# Altium PCB DB31.PcbDoc (part 4 of 8)
Units mil, origin at the board's own origin, x right, y up, seen from the top; angles counter-clockwise.
Board outline 3236.22 x 4456.69 mil, 8 copper layers (Top Layer, MidLayer1, MidLayer2, GND-Layer5, MidLayer3, VCC, MidLayer4, Bottom Layer), stack 61.8 mil thick; 226 components, 469 nets, 1815 pads, 1562 vias.
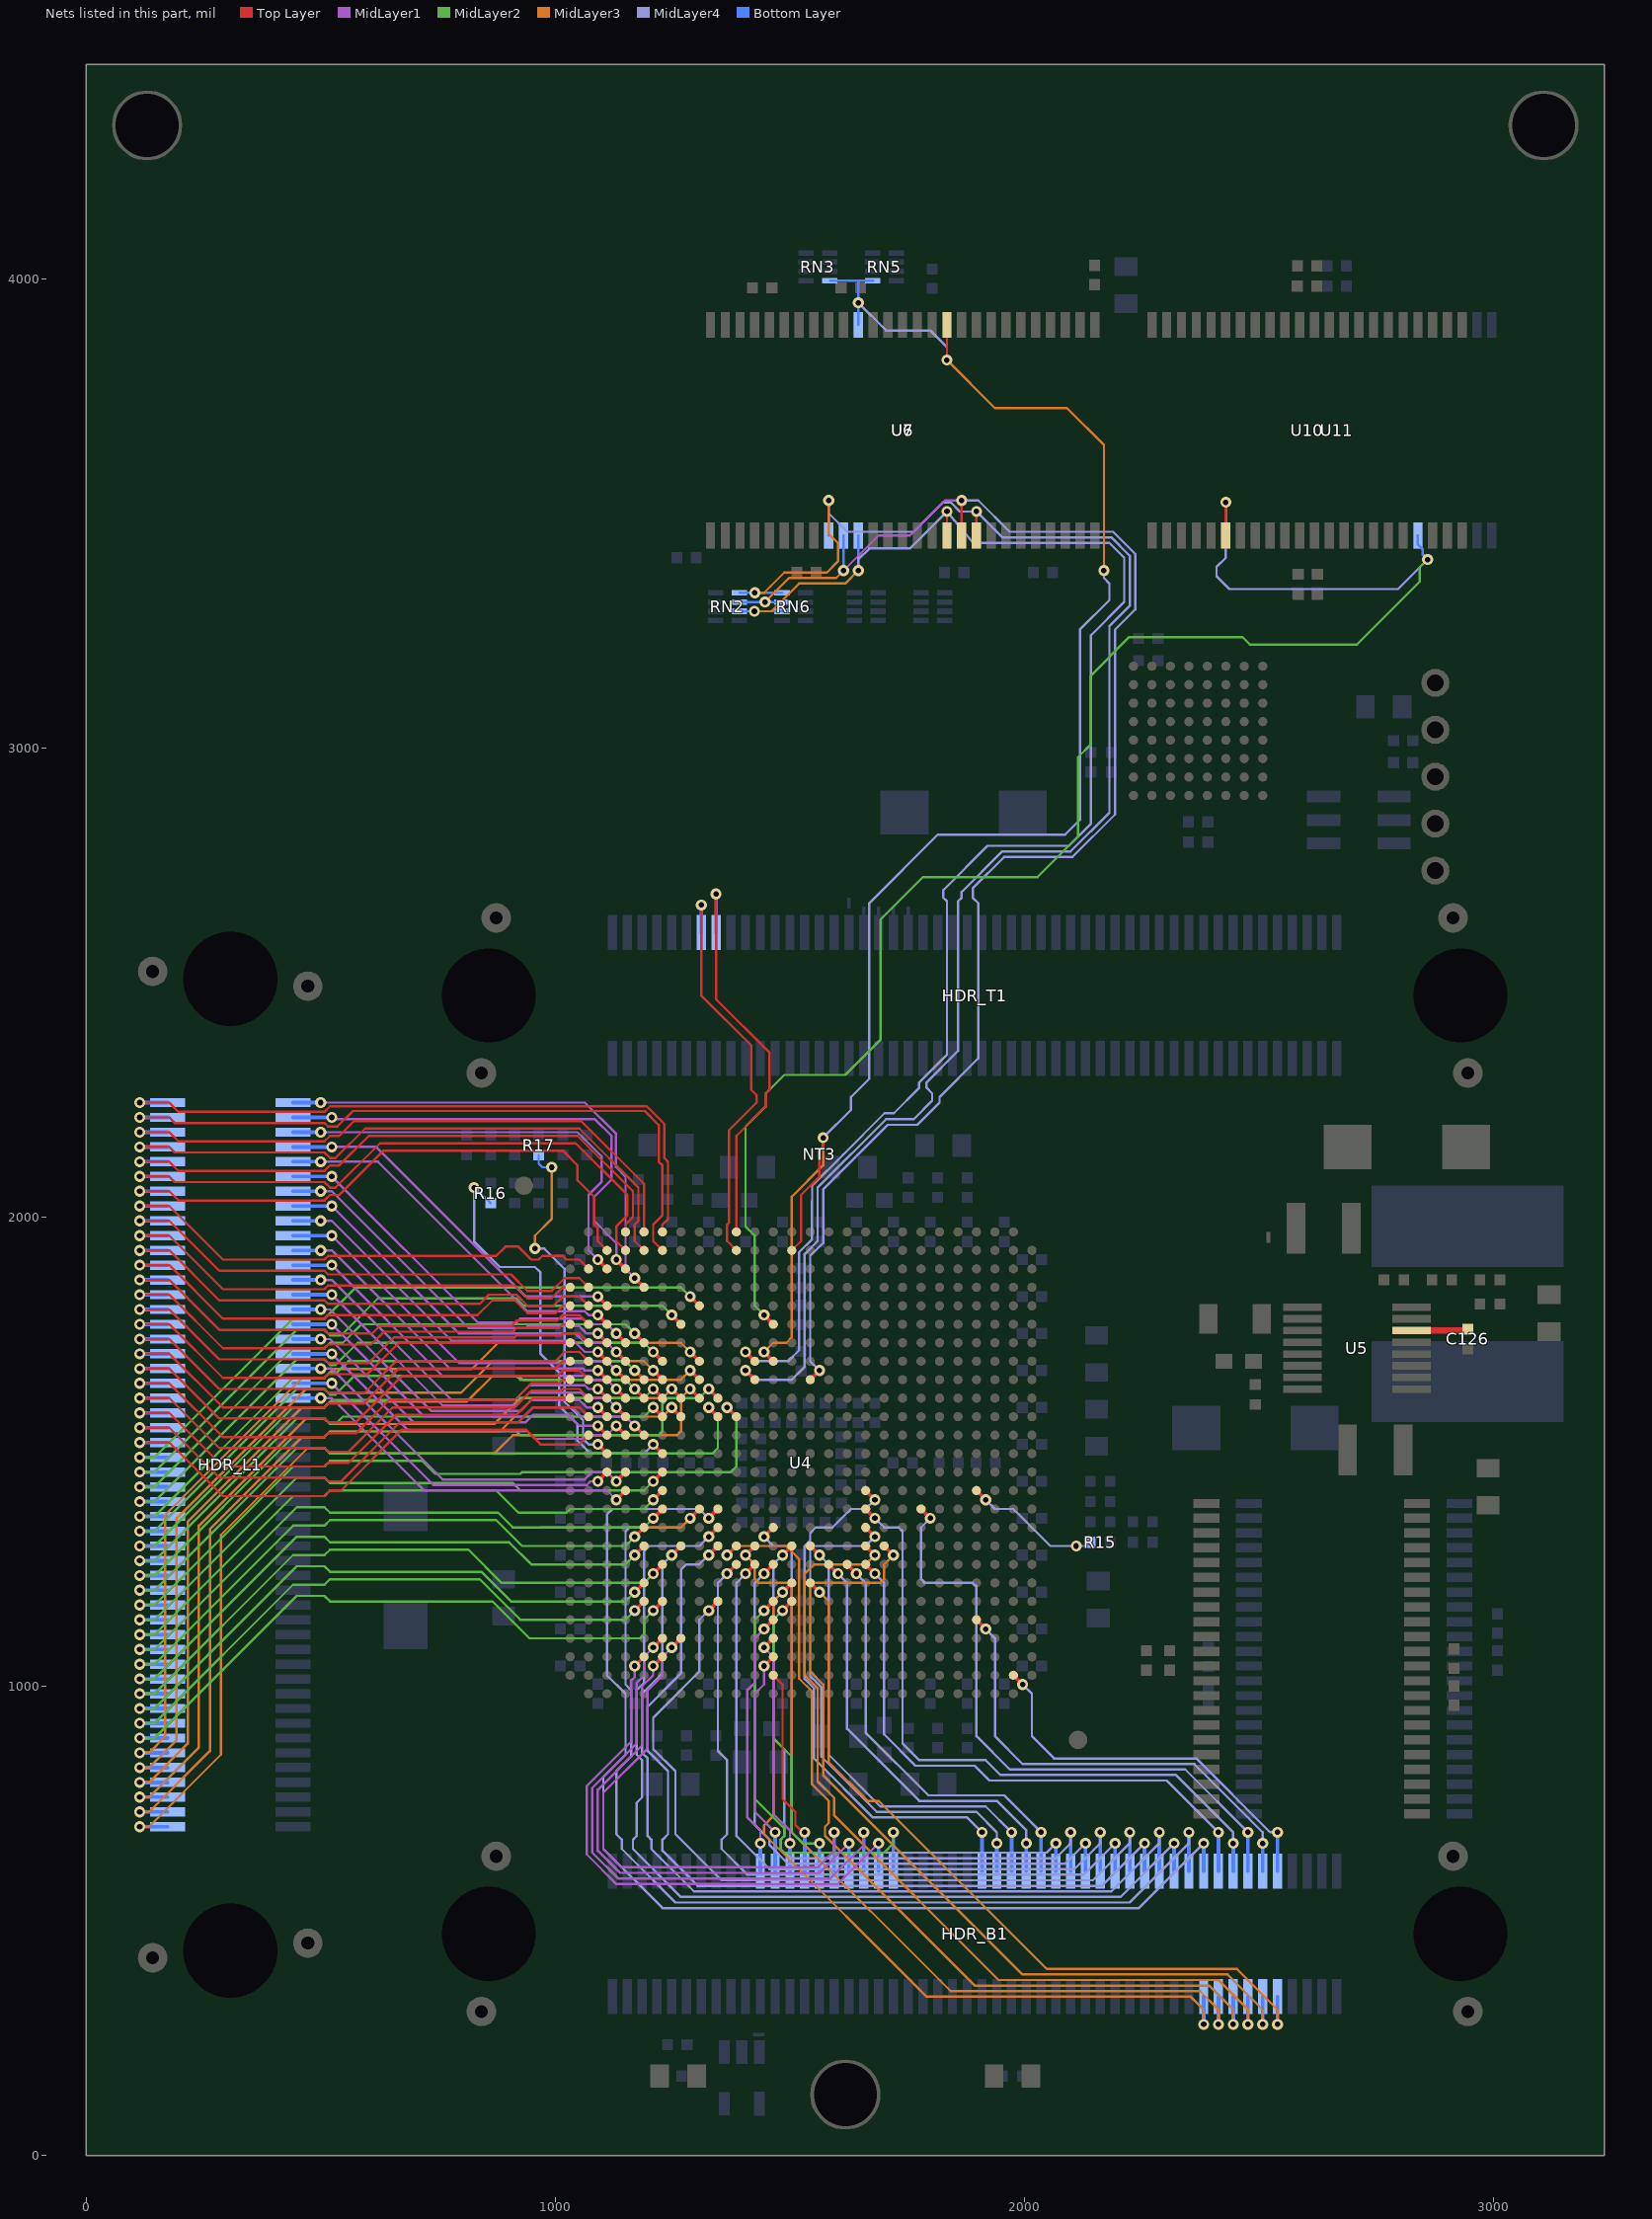
[diagram p10: the nets of this part, all layers, seen from the top]

## Via types
v1: diameter 23.62, hole 11.81, Top Layer to Bottom Layer, 947 vias
v2: diameter 23.62, hole 11.81, Top Layer to Bottom Layer, tented both sides, 476 vias
v3: diameter 27.56, hole 15.75, Top Layer to Bottom Layer, 138 vias
v4: diameter 23.62, hole 11.81, Top Layer to Bottom Layer, tented top, 1 vias

## Nets (pads, with @x,y where several pads share a name; then routed paths per layer and width w, separated by ;. In a path a pad name is that pad's centre, name@x,y a point inside that pad or via, vN(x,y) a via of type N, cw(c..) or ccw(c..) an arc to the next point about the centre after c; other vN are vias at no path point) (continued)
BUS_SDRAM_CLK: NT3.2 RN3.8 RN5.5 U4.H12 U6.38 U7.38 | length 3402.8
  Top Layer w5: NT3.2@1562.99,2141.73 1570.87,2149.61 v1(1570.87,2169.29) ; v2(1834.64,3826.77) U6.38@1834.65,3901.57
  Top Layer w7.87: v1(1444.88,1712.6) U4.H12@1464.57,1692.91
  MidLayer3 w5: v1(1444.88,1712.6) 1464.57,1732.28 1492.13,1732.28 1503.94,1744.09 1503.94,2031.49 1503.94,2039.37 1503.94,2043.31 1570.87,2110.24 v1(1570.87,2169.29) ; v2(1834.64,3826.77) 1937,3724.41 2090.55,3724.41 2169.29,3645.67 v1(2169.29,3377.95)
  MidLayer4 w5: v1(1570.87,2169.29) 1629.92,2228.35 1629.92,2255.91 1669.29,2295.28 1669.29,2669.29 1814.96,2814.96 2086.61,2814.96 2118.11,2846.46 2118.11,3251.97 2181.1,3314.96 2181.1,3350.39 2169.29,3362.2 v1(2169.29,3377.95) ; v2(1645.67,3948.82) 1704.72,3889.76 1799.21,3889.76 1834.64,3854.34 v2(1834.64,3826.77)
  Bottom Layer w5: RN3.8@1586.22,3996.06 RN5.5@1676.19,3996.06 RN5.5@1677.56,3996.06 ; U7.38@1645.67,3901.57 v2(1645.67,3948.82) 1645.67,3996.06
BUS_SDRAM_FEEDBACK: NT3.1 U4.B13 | length 221.3
  Top Layer w5: U4.B13@1503.94,1929.13 1523.62,1948.82 1523.62,2047.24 1562.99,2086.61 NT3.1@1562.99,2125.98
BUS_SDRAM_NCAS: RN2.7 RN6.6 U4.H11 U6.17 U7.17 | length 3407.4
  Top Layer w5: U6.17@1834.65,3452.76 1834.64,3499.99 v1(1834.65,3503.94)
  Top Layer w7.87: v1(1405.51,1712.6) U4.H11@1425.2,1692.91
  MidLayer3 w5: v1(1424.23,3291.34) 1460.63,3291.34 1519.68,3350.39 1618.11,3350.39 v2(1645.67,3377.95)
  MidLayer4 w5: v1(1405.51,1712.6) 1425.2,1692.91 1496.06,1692.91 1519.68,1716.54 1519.68,1925.2 1547.24,1952.76 1547.24,2031.5 1547.49,2039.37 1547.49,2067.18 1613.19,2132.87 1701.77,2221.46 1721.46,2221.46 1775.59,2275.59 1775.59,2287.4 1834.65,2346.46 1834.65,2673.23 1826.77,2681.1 1826.77,2696.85 1921.26,2791.34 2094.49,2791.34 2141.73,2838.58 2141.73,3240.16 2212.6,3311.02 2212.6,3405.51 2181.1,3437.01 1890.42,3437.01 v1(1834.65,3503.94) 1755.91,3425.2 1669.29,3425.2 1645.67,3401.57 v2(1645.67,3377.95)
  Bottom Layer w5: RN2.7@1393.3,3291.34 v1(1424.23,3291.34) RN6.6@1483.28,3291.34 RN6.6@1484.64,3291.34 ; v2(1645.67,3377.95) U7.17@1645.67,3452.76
BUS_SDRAM_NCS: RN2.5 RN6.8 U4.J11 U6.19 U7.19 | length 3648.5
  Top Layer w5: U6.19@1897.64,3452.76 v2(1897.63,3503.93)
  Top Layer w7.87: v1(1405.51,1673.23) U4.J11@1425.2,1653.54
  MidLayer3 w5: v1(1425.2,3330.71) 1444.88,3330.71 1458.54,3344.36 1488.19,3374.02 1578.74,3374.02 1602.36,3397.64 1602.36,3437.01 1582.68,3456.69 v2(1582.68,3527.56)
  MidLayer4 w5: v1(1405.51,1673.23) 1425.2,1653.54 1503.94,1653.54 1527.56,1677.16 ; 1519.68,1669.28 1531.5,1681.09 1531.5,1921.26 1559.06,1948.82 1559.06,2031.5 1559.06,2039.37 1559.06,2062.99 1704.72,2208.66 1763.78,2208.66 1803.15,2248.03 1803.15,2263.78 1791.34,2275.59 1791.34,2287.4 1858.27,2354.33 1858.27,2673.23 1866.14,2681.1 1866.14,2692.91 1952.76,2779.53 2098.43,2779.53 2181.1,2862.2 2181.1,3259.84 2224.41,3303.15 2224.41,3409.45 2185.04,3448.82 1952.76,3448.82 v2(1897.63,3503.93) 1862.21,3503.93 1842.52,3523.62 1826.77,3523.62 1763.78,3460.63 1622.05,3460.63 1582.68,3500 v2(1582.68,3527.56)
  Bottom Layer w5: RN2.5@1393.31,3330.71 v1(1425.2,3330.71) RN6.8@1483.28,3330.71 RN6.8@1484.26,3330.71 ; U7.19@1582.68,3452.76 v2(1582.68,3527.56)
BUS_SDRAM_NRAS: RN2.6 RN6.7 U4.J14 U6.18 U7.18 | length 3371.3
  Top Layer w5: U6.18@1866.14,3452.76 v1(1866.14,3527.55)
  Top Layer w7.87: U4.J14@1543.31,1653.54 v1(1562.99,1673.23)
  MidLayer1 w5: v2(1614.17,3377.95) 1688.98,3452.76 1755.91,3452.76 1830.7,3527.55 v1(1866.14,3527.55)
  MidLayer3 w5: v1(1446.86,3311.02) 1498.05,3362.2 1598.43,3362.2 v2(1614.17,3377.95)
  MidLayer4 w5: v1(1562.99,1673.23) 1543.31,1692.91 1543.31,1917.32 1570.87,1944.88 1570.87,2031.5 1570.87,2039.37 1570.87,2059.05 1708.66,2196.85 1771.65,2196.85 1818.9,2244.09 1818.9,2255.91 1901.57,2338.58 1901.57,2669.29 1889.76,2681.1 1889.76,2700.79 1956.69,2767.72 2102.36,2767.72 2192.91,2858.27 2192.91,3251.97 2236.22,3295.28 2236.22,3413.39 2188.98,3460.63 1968.5,3460.63 1901.58,3527.55 v1(1866.14,3527.55) v1@1858.27,3531.5
  Bottom Layer w5: RN2.6@1393.3,3311.02 v1(1446.86,3311.02) RN6.7@1483.28,3311.03 RN6.7@1484.64,3311.02 ; v2(1614.17,3377.95) U7.18@1614.17,3452.76
BUS_SRAM_NCS: U4.F12 U10.6 U11.6 | length 3565.7
  Top Layer w5: U10.6@2429.13,3452.76 2429.13,3503.94 v2(2429.13,3523.62)
  Top Layer w7.87: v1(1444.88,1791.34) U4.F12@1464.57,1771.65
  MidLayer2 w5: v1(1444.88,1791.34) 1425.2,1811.02 1425.2,1866.14 1425.2,1960.62 1405.51,1980.31 1405.51,2031.49 1405.51,2039.37 1405.51,2192.91 1448.82,2236.22 1448.82,2244.09 1448.82,2263.78 1488.19,2303.15 1618.11,2303.15 1692.91,2377.95 1692.91,2633.86 1783.46,2724.41 2027.56,2724.41 2114.17,2811.02 2114.17,2980.32 2141.73,3007.87 2141.73,3154.53 2223.42,3236.22 2464.57,3236.22 2480.32,3220.47 2708.66,3220.47 2842.52,3354.33 2842.52,3384.83 v2(2859.27,3401.57)
  MidLayer4 w5: v2(2429.13,3523.62) 2429.13,3405.51 2409.45,3385.83 2409.45,3366.14 2437.01,3338.58 2796.28,3338.58 v2(2859.27,3401.57)
  Bottom Layer w5: U11.6@2838.58,3452.76 2838.58,3433.42 2848.92,3423.08 2848.92,3411.92 v2(2859.27,3401.57)
BUZZER: HDR_B1.40 U4.AA12 | length 931.1
  Top Layer w7.87: v1(1444.88,1161.41) U4.AA12@1464.57,1181.1
  MidLayer2 w5: v1(1444.88,1161.41) 1425.2,1141.73 1425.2,921.26 1425.2,909.45 1425.2,759.84 1488.19,696.85 1488.19,681.1 1480.31,673.23 1480.31,653.54 1488.19,645.67 1700.79,645.67 1720.47,665.35 v2(1720.47,688.98)
  Bottom Layer w7.87: HDR_B1.40@1720.48,606.3 v2(1720.47,688.98)
CAN_RXD: HDR_T1.14 U4.B10 | length 878.4
  Top Layer w5: v2(1311.02,2665.35) 1311.02,2472.44 1417.32,2366.14 1417.32,2271.65 1429.13,2259.84 1429.13,2244.09 1370.08,2185.04 1370.08,2043.31 1370.08,2031.5 1370.08,1988.19 1366.14,1984.25 1366.14,1948.82 U4.B10@1385.83,1929.13
  Bottom Layer w7.87: HDR_T1.14@1311.02,2606.3 v2(1311.02,2665.35)
CAN_TXD: HDR_T1.16 U4.A10 | length 879.8
  Top Layer w5: v2(1342.52,2688.98) 1342.52,2464.57 1456.69,2350.39 1456.69,2271.66 1448.82,2263.78 1448.82,2236.22 1385.83,2173.23 1385.83,2043.31 1385.83,2031.5 U4.A10@1385.83,1968.5
  Bottom Layer w7.87: HDR_T1.16@1342.52,2606.3 v2(1342.52,2688.98)
COMP: C126.2 U5.6 | length 121.4
  Top Layer w13.78: U5.6@2824.58,1758.25 2942.3,1758.25 C126.2@2944.88,1760.82
CONF_DONE: R15.2 U4.R23 | length 302.6
  Top Layer w7.87: U4.R23@1897.64,1417.32 v1(1917.33,1397.64)
  MidLayer4 w5: v1(1917.33,1397.64) 1937.01,1377.95 1976.38,1377.95 2055.12,1299.21 v1(2110.24,1299.21)
  Bottom Layer w5: v1@2110.24,1307.08 v1(2110.24,1299.21) 2132.36,1299.21 R15.2@2140.23,1307.08
DATA0: R17.2 U4.N3 | length 760.6
  Top Layer w7.87: v1(1090.55,1515.75) U4.N3@1110.24,1496.06
  MidLayer3 w5: v1(956.69,1933.07) 956.69,1960.63 992.13,1996.06 v1(992.13,2106.3)
  MidLayer4 w5: v1(956.69,1933.07) 976.38,1933.07 1019.69,1889.76 1019.69,1606.3 1059.06,1566.93 1059.06,1527.56 1070.87,1515.75 v1(1090.55,1515.75)
  Bottom Layer w5: R17.2@964.56,2132.36 964.56,2114.18 972.44,2106.3 v1(992.13,2106.3)
DAU_RESET_SW: HDR_B1.38 U4.AD5 | length 1214.9
  Top Layer w7.87: v1(1169.29,1043.3) U4.AD5@1188.98,1062.99
  MidLayer1 w5: v1(1169.29,1043.3) 1169.29,1019.68 1161.42,1011.81 1161.42,921.26 1161.42,909.45 1161.42,881.89 1066.93,787.4 1066.93,641.73 1129.92,578.74 1602.36,578.74 v2(1688.98,665.35)
  Bottom Layer w7.87: HDR_B1.38@1688.98,606.3 v2(1688.98,665.35)
DAU_TFT_BLIGHT: HDR_B1.91 U4.Y14 | length 1664
  Top Layer w7.87: U4.Y14@1543.31,1220.47 v1(1562.99,1200.78)
  MidLayer3 w5: v1(1562.99,1200.78) 1582.68,1181.1 1582.68,921.26 1582.68,909.45 1582.68,838.58 1665.35,755.91 1688.98,755.91 2047.24,397.64 2452.76,397.64 2539.37,311.02 v2(2539.37,279.53)
  Bottom Layer w7.87: v2(2539.37,279.53) HDR_B1.91@2539.37,338.58
DAU_TFT_BLUE0: HDR_B1.62 U4.U12 | length 1346.5
  Top Layer w7.87: v1(1444.88,1318.9) U4.U12@1464.57,1338.58
  MidLayer4 w5: v1(1444.88,1318.9) 1464.57,1299.21 1492.13,1299.21 1503.94,1287.4 1503.94,921.26 1503.94,909.45 1503.94,688.98 1547.24,645.67 2047.24,645.67 v2(2066.93,665.35)
  Bottom Layer w7.87: HDR_B1.62@2066.93,606.3 v2(2066.93,665.35)
DAU_TFT_BLUE1: HDR_B1.64 U4.V13 | length 1420.6
  Top Layer w7.87: v1(1484.25,1279.53) U4.V13@1503.94,1299.21
  MidLayer4 w5: v1(1484.25,1279.53) 1464.57,1259.84 1464.57,921.26 1464.57,909.45 1464.57,889.76 1488.19,866.14 1488.19,681.1 1480.31,673.23 1480.31,653.54 1500,633.86 2066.93,633.86 2098.42,665.35 v2(2098.42,688.98)
  Bottom Layer w7.87: v2(2098.42,688.98) HDR_B1.64@2098.43,606.3
DAU_TFT_BLUE2: HDR_B1.66 U4.W12 | length 1394.3
  Top Layer w7.87: v1(1444.88,1240.16) U4.W12@1464.57,1259.84
  MidLayer4 w5: v1(1444.88,1240.16) 1425.2,1220.47 1425.2,921.26 1425.2,909.45 1425.2,704.72 1456.69,673.23 1456.69,661.42 1496.06,622.05 2086.62,622.05 v2(2129.92,665.35)
  Bottom Layer w7.87: HDR_B1.66@2129.92,606.3 v2(2129.92,665.35)
DAU_TFT_BLUE3: HDR_B1.68 U4.W11 | length 1529.1
  Top Layer w7.87: v1(1405.51,1240.16) U4.W11@1425.2,1259.84
  MidLayer4 w5: v1(1405.51,1240.16) 1385.83,1220.47 1385.83,921.26 1385.83,909.45 1385.83,681.1 1456.69,610.24 2106.3,610.24 2161.42,665.35 v2(2161.42,688.98)
  Bottom Layer w7.87: HDR_B1.68@2161.42,606.3 v2(2161.42,688.98)
DAU_TFT_BLUE4: HDR_B1.70 U4.W10 | length 1583.8
  Top Layer w7.87: v1(1366.14,1240.16) U4.W10@1385.83,1259.84
  MidLayer4 w5: v1(1366.14,1240.16) 1346.46,1220.47 1346.46,921.26 1346.46,909.45 1346.46,862.2 1366.14,842.52 1366.14,685.04 1354.33,673.23 1354.33,653.54 1409.45,598.43 2125.98,598.43 v2(2192.91,665.35)
  Bottom Layer w7.87: HDR_B1.70@2192.92,606.3 v2(2192.91,665.35)
DAU_TFT_CL1: HDR_B1.88 U4.T20 | length 1355.7
  Top Layer w7.87: U4.T20@1779.53,1377.95 v1(1799.22,1358.27)
  MidLayer4 w5: v1(1799.22,1358.27) 1779.53,1338.58 1779.53,1228.35 1787.4,1220.47 1889.76,1220.47 1897.64,1212.6 1897.64,921.26 1897.64,911.26 1897.64,893.7 1968.5,822.83 2342.52,822.83 v2@2476.38,688.98
  Bottom Layer w7.87: HDR_B1.88@2476.38,606.3 v2(2476.38,688.98)
DAU_TFT_CL2: HDR_B1.90 U4.AB23 | length 1061.7
  Top Layer w7.87: U4.AB23@1897.64,1141.73 v1(1917.33,1122.04)
  MidLayer4 w5: v1(1917.33,1122.04) 1937.01,1102.36 1937.01,921.26 1937.01,909.45 1937.01,893.7 1996.06,834.65 2362.2,834.65 2507.87,688.98 v2(2507.87,665.35)
  Bottom Layer w7.87: v2(2507.87,665.35) HDR_B1.90@2507.88,606.3 v2(2507.87,665.35)
DAU_TFT_CL3: HDR_B1.92 U4.AE25 | length 837.3
  Top Layer w7.87: U4.AE25@1976.38,1023.62 v1(1996.07,1003.94)
  MidLayer4 w5: v1(1996.07,1003.94) 2015.75,984.25 2015.75,921.26 2015.75,909.45 2015.75,893.7 2062.99,846.46 2366.14,846.46 2523.62,688.98 v2(2539.37,688.98)
  Bottom Layer w7.87: HDR_B1.92@2539.37,606.3 v2(2539.37,688.98)
DAU_TFT_DISP_ON: HDR_B1.89 U4.V18 | length 1898.8
  Top Layer w7.87: U4.V18@1700.79,1299.21 v1(1720.47,1279.53)
  MidLayer3 w5: v1(1720.47,1279.53) 1700.79,1259.84 1700.79,1228.35 1692.91,1220.47 1551.18,1220.47 1543.31,1212.6 1543.31,1031.49 1570.87,1003.94 1570.87,921.26 1570.87,909.45 1570.87,811.02 1996.06,385.83 2433.07,385.83 2507.87,311.02 v2(2507.88,279.53)
  Bottom Layer w7.87: v2(2507.88,279.53) HDR_B1.89@2507.88,338.58
DAU_TFT_GREEN0: HDR_B1.72 U4.AA9 | length 1720.9
  Top Layer w7.87: v1(1326.77,1161.42) U4.AA9@1346.46,1181.1
  MidLayer4 w5: v1(1326.77,1161.42) 1307.09,1141.73 1307.09,1031.5 1208.66,933.07 1208.66,921.26 1208.66,909.45 1208.66,866.14 1255.91,818.9 1255.91,685.04 1354.33,586.61 2145.67,586.61 2224.41,665.36 v2(2224.41,688.98)
  Bottom Layer w7.87: HDR_B1.72@2224.41,606.3 v2(2224.41,688.98)
DAU_TFT_GREEN1: HDR_B1.74 U4.V9 | length 1905.7
  Top Layer w7.87: v1(1326.77,1279.53) U4.V9@1346.46,1299.21
  MidLayer4 w5: v1(1326.77,1279.53) 1307.09,1259.84 1279.53,1259.84 1267.72,1248.03 1267.72,1027.56 1196.85,956.69 1196.85,921.26 1196.85,909.45 1196.85,862.2 1240.16,818.9 1240.16,685.04 1228.35,673.23 1228.35,649.61 1303.15,574.8 2165.35,574.8 v2(2255.9,665.35)
  Bottom Layer w7.87: HDR_B1.74@2255.91,606.3 v2(2255.9,665.35)
DAU_TFT_GREEN2: HDR_B1.76 U4.V7 | length 1957
  Top Layer w7.87: v1(1248.03,1279.53) U4.V7@1267.72,1299.21
  MidLayer4 w5: v1(1248.03,1279.53) 1228.35,1259.84 1228.35,1027.56 1185.04,984.25 1185.04,921.26 1185.04,909.45 1185.04,858.27 1196.85,846.46 1196.85,681.1 1204.72,673.23 1204.72,653.54 1295.28,562.99 2185.04,562.99 2287.4,665.35 v2(2287.4,688.98)
  Bottom Layer w7.87: HDR_B1.76@2287.41,606.3 v2(2287.4,688.98)
DAU_TFT_GREEN3: HDR_B1.78 U4.U9 | length 2134.4
  Top Layer w7.87: v1(1326.77,1318.9) U4.U9@1346.46,1338.58
  MidLayer4 w5: v1(1326.77,1318.9) 1307.09,1299.21 1200.79,1299.21 1188.98,1287.4 1188.98,1007.87 1173.23,992.13 1173.23,921.26 1173.23,909.45 1173.23,854.33 1185.04,842.52 1185.04,763.78 1173.23,751.97 1173.23,681.1 1165.35,673.23 1165.35,653.54 1267.72,551.18 2204.72,551.18 v2(2318.9,665.35)
  Bottom Layer w7.87: HDR_B1.78@2318.9,606.3 v2(2318.9,665.35)
DAU_TFT_GREEN4: HDR_B1.80 U4.T8 | length 2618.5
  Top Layer w7.87: v1(1287.4,1358.27) U4.T8@1307.09,1377.95
  MidLayer3 w5: 968.51,1338.58 1267.72,1338.58 v1(1287.4,1358.27)
  MidLayer4 w5: v1(1287.4,1358.27) 1267.72,1338.58 1157.48,1338.58 1149.61,1330.71 1149.61,1003.94 1161.42,992.13 1161.42,921.26 1161.42,909.45 1161.42,850.39 1129.92,818.9 1129.92,685.04 1141.73,673.23 1141.73,653.54 1255.91,539.37 2224.41,539.37 2350.39,665.35 v2(2350.39,688.98)
  Bottom Layer w7.87: HDR_B1.80@2350.4,606.3 v2(2350.39,688.98)
DAU_TFT_GREEN5: HDR_B1.82 U4.T9 | length 2453.7
  Top Layer w7.87: v1(1326.77,1358.27) U4.T9@1346.46,1377.95
  MidLayer4 w5: v1(1326.77,1358.27) 1307.09,1377.95 1122.05,1377.95 1110.24,1366.14 1110.24,1023.62 1149.61,984.25 1149.61,921.26 1149.61,909.45 1149.61,854.33 1102.36,807.09 1102.36,653.54 1228.35,527.56 2244.09,527.56 v2(2381.89,665.35)
  Bottom Layer w7.87: HDR_B1.82@2381.89,606.3 v2(2381.89,665.35)
DAU_TFT_IRQ: HDR_B1.81 U4.Y13 | length 1742.4
  Top Layer w7.87: v1(1484.25,1200.78) U4.Y13@1503.94,1220.47
  MidLayer3 w5: v1(1484.25,1200.78) 1464.57,1181.1 1464.57,921.26 1464.57,909.45 1464.57,723.43 1444.88,703.74 1444.88,685.04 1791.34,338.58 2354.33,338.58 2381.89,311.02 v2(2381.89,279.53)
  Bottom Layer w7.87: v2(2381.89,279.53) HDR_B1.81@2381.89,338.58
DAU_TFT_M: HDR_B1.87 U4.V17 | length 1879.3
  Top Layer w7.87: U4.V17@1661.42,1299.21 v1(1681.1,1279.53)
  MidLayer3 w5: v1(1681.1,1279.53) 1661.42,1259.84 1551.18,1259.84 1531.5,1240.16 1531.5,1160.43 1531.5,1023.62 1559.06,996.06 1559.06,921.26 1559.06,909.45 1559.06,797.24 1594.49,761.81 1594.49,724.41 1944.88,374.02 2413.39,374.02 2476.38,311.02 v2(2476.38,279.53)
  Bottom Layer w7.87: v2(2476.38,279.53) HDR_B1.87@2476.38,338.58
DAU_TFT_MUX: HDR_B1.85 U4.V10 | length 1934.8
  Top Layer w7.87: v1(1366.14,1279.53) U4.V10@1385.83,1299.21
  MidLayer3 w5: v1(1366.14,1279.53) 1385.83,1299.21 1492.13,1299.21 1519.68,1271.65 1519.68,1016.73 1547.24,989.17 1547.24,921.26 1547.24,909.45 1547.24,791.34 1582.68,755.91 1582.68,708.66 1574.8,700.79 1574.8,681.1 1893.7,362.2 2393.7,362.2 2444.88,311.02 v2(2444.88,279.53)
  Bottom Layer w7.87: v2(2444.88,279.53) HDR_B1.85@2444.89,338.58
DAU_TFT_POL: HDR_B1.83 U4.V11 | length 1852.6
  Top Layer w7.87: v1(1405.51,1279.53) U4.V11@1425.2,1299.21
  MidLayer3 w5: v1(1405.51,1279.53) 1425.2,1259.84 1425.2,1228.35 1433.07,1220.47 1496.06,1220.47 1503.94,1212.6 1503.94,921.26 1503.94,909.45 1503.94,688.98 1842.52,350.39 2374.02,350.39 2413.39,311.03 v2(2413.39,279.53)
  Bottom Layer w7.87: v2(2413.39,279.53) HDR_B1.83@2413.39,338.58
DAU_TFT_RED0: HDR_B1.52 U4.R17 | length 1194.5
  Top Layer w7.87: U4.R17@1661.42,1417.32 v1(1681.1,1397.64)
  MidLayer4 w5: v1(1681.1,1397.64) 1661.42,1377.95 1629.92,1377.95 1590.55,1338.58 1555.12,1338.58 1543.31,1326.77 1543.31,1311.02 1531.5,1299.21 1531.5,1015.75 1551.18,996.06 1551.18,921.26 1551.18,909.45 1551.18,846.46 1677.17,720.47 1870.08,720.47 1877.95,720.47 v2(1909.45,688.98)
  Bottom Layer w7.87: HDR_B1.52@1909.45,606.3 v2(1909.45,688.98)
DAU_TFT_RED1: HDR_B1.54 U4.U17 | length 1151.3
  Top Layer w7.87: U4.U17@1661.42,1338.58 v1(1681.1,1318.9)
  MidLayer4 w5: v1(1681.1,1318.9) 1661.42,1299.21 1551.18,1299.21 1543.31,1291.34 1543.31,1021.65 1566.93,998.03 1566.93,921.26 1566.93,909.45 1566.93,850.39 1685.04,732.28 1897.64,732.28 1940.94,688.98 v2(1940.94,665.35)
  Bottom Layer w7.87: HDR_B1.54@1940.95,606.3 v2(1940.94,665.35)
DAU_TFT_RED2: HDR_B1.56 U4.V14 | length 1002.1
  Top Layer w7.87: U4.V14@1543.31,1299.21 v1(1562.99,1279.53)
  MidLayer4 w5: v1(1562.99,1279.53) 1582.68,1259.84 1582.68,921.26 1582.68,909.45 1582.68,854.33 1692.91,744.1 1881.89,744.1 1917.32,744.09 v2(1972.44,688.98)
  Bottom Layer w7.87: HDR_B1.56@1972.44,606.3 v2(1972.44,688.98)
DAU_TFT_RED3: HDR_B1.58 U4.W15 | length 924.9
  Top Layer w7.87: U4.W15@1582.68,1259.84 v1(1602.36,1240.16)
  MidLayer4 w5: v1(1602.36,1240.16) 1622.05,1220.47 1622.05,921.26 1622.05,909.45 1775.59,755.91 1940.94,755.91 2003.94,692.92 v2(2003.94,665.35)
  Bottom Layer w7.87: HDR_B1.58@2003.94,606.3 v2(2003.94,665.35)
DAU_TFT_RED4: HDR_B1.60 U4.W16 | length 935.1
  Top Layer w7.87: U4.W16@1622.05,1259.84 v1(1641.73,1240.16)
  MidLayer4 w5: v1(1641.73,1240.16) 1661.42,1220.47 1661.42,921.26 1661.42,910.43 1661.42,901.57 1795.28,767.71 1956.69,767.71 ; 1940.94,767.72 1956.69,767.72 ; v2(2035.43,688.98) 1956.69,767.71
  Bottom Layer w7.87: HDR_B1.60@2035.44,606.3 v2(2035.43,688.98)
DAU_TFT_STH: HDR_B1.86 U4.T17 | length 1416.7
  Top Layer w7.87: U4.T17@1661.42,1377.95 v1(1681.1,1358.27)
  MidLayer4 w5: v1(1681.1,1358.27) 1700.79,1338.58 1732.28,1338.58 1740.16,1330.71 1740.16,921.26 1740.16,909.45 1740.16,877.95 1775.59,842.52 1917.32,842.52 1948.82,811.02 2322.84,811.02 2444.88,688.98 v2(2444.88,665.35)
  Bottom Layer w7.87: HDR_B1.86@2444.89,606.3 v2(2444.88,665.35)
DAU_TFT_STV: HDR_B1.84 U4.W17 | length 1260.2
  Top Layer w7.87: U4.W17@1661.42,1259.84 v1(1681.1,1240.16)
  MidLayer4 w5: v1(1681.1,1240.16) 1700.79,1220.47 1700.79,921.26 1700.79,911.26 1700.79,897.64 1767.72,830.71 1893.7,830.71 1925.2,799.21 2303.15,799.21 v2@2413.38,688.98
  Bottom Layer w7.87: HDR_B1.84@2413.39,606.3 v2(2413.38,688.98)
DCLK: R16.2 U4.N6 | length 931.9
  Top Layer w7.87: v1(1208.66,1515.75) U4.N6@1228.35,1496.06
  MidLayer4 w5: v1(826.77,2062.99) 826.77,1948.6 881.67,1893.7 956.69,1893.7 968.5,1881.89 968.5,1708.66 1007.87,1669.29 1007.87,1598.42 1047.24,1559.05 1047.24,1523.62 1059.88,1510.98 1074.8,1496.06 1188.98,1496.06 v1(1208.66,1515.75)
  Bottom Layer w5: v1(826.77,2062.99) 860.7,2031.5 R16.2@862.2,2030
DIP0: HDR_B1.22 U4.AB12 | length 569.7
  Top Layer w7.87: v1(1444.88,1122.04) U4.AB12@1464.57,1141.73
  MidLayer1 w5: v2(1437.01,665.35) 1437.01,692.91 1409.45,720.47 1409.45,909.45 1409.45,921.26 1409.45,992.13 1425.2,1007.87 1425.2,1102.36 v1(1444.88,1122.04)
  Bottom Layer w7.87: HDR_B1.22@1437.01,606.3 v2(1437.01,665.35)
DIP1: HDR_B1.24 U4.AD12 | length 490.9
  Top Layer w7.87: v1(1444.88,1043.3) U4.AD12@1464.57,1062.99
  MidLayer1 w5: v1(1444.88,1043.3) 1444.88,1003.93 1425.2,984.25 1425.2,921.26 1425.2,909.45 1425.2,732.28 v2(1468.5,688.98)
  Bottom Layer w7.87: HDR_B1.24@1468.51,606.3 v2(1468.5,688.98)
DIP2: HDR_B1.26 U4.AC12 | length 527
  Top Layer w7.87: v1(1444.88,1082.67) U4.AC12@1464.57,1102.36
  MidLayer1 w5: v1(1444.88,1082.67) 1464.57,1062.99 1464.57,921.26 1464.57,909.45 1464.57,728.35 1500,692.91 v2(1500,665.35)
  Bottom Layer w7.87: HDR_B1.26@1500,606.3 v2(1500,665.35)
DIP3: HDR_B1.28 U4.AE12 | length 447.4
  Top Layer w5: U4.AE12@1464.57,1023.62 1484.25,1003.93 1484.25,921.26 1484.25,909.45 1484.25,759.84 1511.81,732.28 1511.81,704.72 1527.56,688.98 v2(1531.5,688.98)
  Bottom Layer w7.87: HDR_B1.28@1531.5,606.3 v2(1531.5,688.98)
DIP4: HDR_B1.30 U4.AA13 | length 652.6
  Top Layer w7.87: v1(1484.25,1161.41) U4.AA13@1503.94,1181.1
  MidLayer2 w5: v1(1484.25,1161.41) 1464.57,1141.73 1464.57,921.26 1464.57,909.45 1464.57,889.76 1503.94,850.39 1503.94,688.98 1527.56,665.35 v2(1562.99,665.35)
  Bottom Layer w7.87: HDR_B1.30@1562.99,606.3 v2(1562.99,665.35)
DIP5: HDR_B1.32 U4.AC7 | length 1162.5
  Top Layer w7.87: v1(1248.03,1082.67) U4.AC7@1267.72,1102.36
  MidLayer1 w5: v1(1248.03,1082.67) 1228.35,1062.99 1228.35,1023.62 1196.85,992.12 1196.85,921.26 1196.85,909.45 1196.85,867.82 1102.36,773.33 1102.36,653.54 1141.73,614.17 1559.06,614.17 1594.49,649.61 v2(1594.49,688.98)
  Bottom Layer w7.87: HDR_B1.32@1594.49,606.3 v2(1594.49,688.98)
DIP6: HDR_B1.34 U4.AD6 | length 1110.6
  Top Layer w7.87: v1(1208.66,1043.3) U4.AD6@1228.35,1062.99
  MidLayer1 w5: v1(1208.66,1043.3) 1208.66,1023.62 1185.04,1000 1185.04,921.26 1185.04,909.45 1185.04,874.02 1090.55,779.53 1090.55,649.61 1137.8,602.36 1562.99,602.36 v2(1625.98,665.35)
  Bottom Layer w7.87: HDR_B1.34@1625.99,606.3 v2(1625.98,665.35)
DIP7: HDR_B1.36 U4.AC6 | length 1259.8
  Top Layer w7.87: v1(1208.66,1082.67) U4.AC6@1228.35,1102.36
  MidLayer1 w5: v1(1208.66,1082.67) 1188.98,1062.99 1188.98,1023.62 1173.23,1007.87 1173.23,921.26 1173.23,909.45 1173.23,877.95 1078.74,783.46 1078.74,645.67 1133.86,590.55 1586.61,590.55 1657.48,661.42 v2(1657.48,688.98)
  Bottom Layer w7.87: HDR_B1.36@1657.48,606.3 v2(1657.48,688.98)
EXTEND_A0: HDR_L1.1 U4.A6 | length 1467.7
  Top Layer w5: v2(114.17,2244.09) 177.17,2244.09 196.85,2224.41 409.45,2224.41 ; 385.83,2224.41 507.88,2224.41 519.69,2236.22 1194.66,2236.22 1232.28,2198.6 1232.28,2125.98 1240.16,2118.11 1240.16,2043.31 1240.16,2031.5 1240.16,1996.06 1228.35,1984.25 U4.A6@1228.35,1968.5
  Bottom Layer w7.87: v2(114.17,2244.09) HDR_L1.1@173.23,2244.09
EXTEND_A1: HDR_L1.3 U4.B6 | length 1533.7
  Top Layer w5: v2(114.17,2212.6) 153.54,2212.6 ; 137.8,2212.6 177.17,2212.6 188.98,2200.79 409.45,2200.79 ; 377.95,2200.79 507.88,2200.79 515.75,2192.91 535.43,2192.91 568.74,2226.22 1190.52,2226.22 1220.47,2196.27 1220.47,2118.11 1228.35,2110.24 1228.35,2043.31 1228.35,2031.5 1228.35,2003.94 1208.66,1984.25 1208.66,1948.82 U4.B6@1228.35,1929.13
  Bottom Layer w7.87: v2(114.17,2212.6) HDR_L1.3@173.23,2212.6
EXTEND_A2: HDR_L1.5 U4.A5 | length 1337.4
  Top Layer w5: v2(114.17,2181.1) 157.48,2181.1 ; 137.8,2181.1 177.17,2181.1 196.85,2161.42 507.88,2161.42 519.69,2173.23 539.37,2173.23 570.87,2204.72 1055.12,2204.72 1188.98,2070.87 1188.98,2043.31 1188.98,2031.5 U4.A5@1188.98,1968.5
  Bottom Layer w7.87: v2(114.17,2181.1) HDR_L1.5@173.23,2181.1
EXTEND_A3: HDR_L1.7 U4.B5 | length 1371.1
  Top Layer w5: v2(114.17,2149.61) 153.54,2149.61 ; 137.8,2149.61 177.17,2149.61 188.98,2137.8 507.88,2137.8 519.69,2125.98 531.5,2125.98 594.49,2188.98 1051.18,2188.98 1177.17,2062.99 1177.17,2043.31 1177.17,2031.5 1177.17,1992.12 1169.29,1984.25 1169.29,1948.82 U4.B5@1188.98,1929.13
  Bottom Layer w7.87: v2(114.17,2149.61) HDR_L1.7@173.23,2149.6
EXTEND_A4: HDR_L1.9 U4.A4 | length 1326.9
  Top Layer w5: v2(114.17,2118.11) 149.6,2118.11 ; 137.8,2118.11 177.17,2118.11 196.85,2098.43 409.45,2098.43 ; 385.83,2098.43 507.88,2098.43 519.69,2110.24 539.37,2110.24 602.36,2173.23 1047.24,2173.23 1165.35,2055.12 1165.35,2043.31 1165.35,2031.5 1165.35,2000 1149.61,1984.25 U4.A4@1149.61,1968.5
  Bottom Layer w7.87: v2(114.17,2118.11) HDR_L1.9@173.23,2118.11
EXTEND_A5: HDR_L1.11 U4.B4 | length 1340.9
  Top Layer w5: v2(114.17,2086.62) 149.61,2086.62 ; 137.8,2086.61 177.17,2086.61 188.98,2074.8 507.88,2074.8 519.69,2062.99 531.5,2062.99 625.98,2157.48 1043.31,2157.48 1153.54,2047.24 1153.54,2043.31 1153.54,2031.5 1153.54,2003.94 1129.92,1980.32 1129.92,1948.82 U4.B4@1149.61,1929.13
  Bottom Layer w7.87: v2(114.17,2086.62) HDR_L1.11@173.23,2086.61
EXTEND_A6: HDR_L1.13 U4.B3 | length 1300
  Top Layer w5: v2(114.17,2055.12) 149.61,2055.12 ; 137.8,2055.12 177.16,2055.12 196.85,2035.43 409.45,2035.43 ; 385.83,2035.43 507.88,2035.43 519.69,2047.24 539.37,2047.24 633.86,2141.73 1015.75,2141.73 1047.24,2110.24 1047.24,2078.74 1082.68,2043.31 1082.68,2031.5 1082.68,1984.25 1090.55,1976.38 1090.55,1948.82 U4.B3@1110.24,1929.13
  Bottom Layer w7.87: v2(114.17,2055.12) HDR_L1.13@173.23,2055.12
EXTEND_A7: HDR_L1.15 U4.C2 | length 1112.4
  Top Layer w5: v2(114.17,2023.62) 149.61,2023.62 ; 137.8,2023.62 177.16,2023.62 291.34,1909.45 507.87,1909.45 515.75,1917.32 874.02,1917.32 893.7,1937.01 921.26,1937.01 948.82,1909.45 964.57,1909.45 972.44,1917.32 1015.75,1917.32 1023.62,1909.45 1051.18,1909.45 U4.C2@1070.87,1889.76
  Bottom Layer w7.87: v2(114.17,2023.62) HDR_L1.15@173.23,2023.62
EXTEND_A8: HDR_L1.17 U4.D2 | length 1109.1
  Top Layer w5: v2(114.17,1992.13) 149.61,1992.13 ; 137.8,1992.13 177.16,1992.13 283.46,1885.83 507.87,1885.83 515.75,1877.95 905.51,1877.95 940.94,1842.52 956.69,1842.52 968.5,1842.52 992.13,1842.52 1019.68,1870.08 1051.18,1870.08 U4.D2@1070.87,1850.39
  Bottom Layer w7.87: v2(114.17,1992.13) HDR_L1.17@173.23,1992.12
EXTEND_A9: HDR_L1.19 U4.D1 | length 1059.9
  Top Layer w5: v2(114.17,1960.63) 149.61,1960.63 ; 137.8,1960.63 177.16,1960.63 291.34,1846.46 507.87,1846.46 515.75,1854.33 913.39,1854.33 940.94,1826.77 956.69,1826.77 968.5,1826.77 992.13,1826.77 1015.75,1850.39 U4.D1@1031.5,1850.39
  Bottom Layer w7.87: v2(114.17,1960.63) HDR_L1.19@173.23,1960.63
EXTEND_A10: HDR_L1.21 U4.E2 | length 1109.1
  Top Layer w5: v2(114.17,1929.13) 149.61,1929.13 ; 137.8,1929.13 177.16,1929.13 283.46,1822.83 507.87,1822.83 515.75,1814.96 838.58,1814.96 858.27,1834.65 917.32,1834.65 940.94,1811.02 956.69,1811.02 968.5,1811.02 996.06,1811.02 1015.75,1830.71 1051.18,1830.71 U4.E2@1070.87,1811.02
  Bottom Layer w7.87: v2(114.17,1929.13) HDR_L1.21@173.23,1929.13
EXTEND_A11: HDR_L1.23 U4.E1 | length 1069.7
  Top Layer w5: v2(114.17,1897.64) 149.61,1897.64 ; 137.8,1897.64 177.16,1897.64 291.34,1783.46 507.87,1783.46 515.75,1791.34 834.64,1791.34 866.14,1822.83 913.39,1822.83 940.94,1795.28 956.69,1795.28 968.5,1795.28 1000,1795.28 1015.75,1811.02 U4.E1@1031.5,1811.02
  Bottom Layer w7.87: v2(114.17,1897.64) HDR_L1.23@173.23,1897.64
EXTEND_A12: HDR_L1.25 U4.F2 | length 1099.3
  Top Layer w5: v2(114.17,1866.14) 149.61,1866.14 ; 137.8,1866.14 177.16,1866.14 283.46,1759.84 507.87,1759.84 515.75,1751.97 609.25,1751.97 625,1767.72 905.51,1767.72 917.32,1779.53 956.69,1779.53 968.5,1779.53 1003.94,1779.53 1015.75,1791.34 1051.18,1791.34 U4.F2@1070.87,1771.65
  Bottom Layer w7.87: v2(114.17,1866.14) HDR_L1.25@173.23,1866.14
EXTEND_A13: HDR_L1.27 U4.F1 | length 1056.7
  Top Layer w5: v2(114.17,1834.65) 149.61,1834.65 ; 137.8,1834.65 177.16,1834.65 291.34,1720.47 507.87,1720.47 515.75,1728.35 607.28,1728.35 634.84,1755.91 909.45,1755.91 917.32,1763.78 956.69,1763.78 968.5,1763.78 1007.87,1763.78 1015.75,1771.65 U4.F1@1031.5,1771.65
  Bottom Layer w7.87: v2(114.17,1834.65) HDR_L1.27@173.23,1834.64
EXTEND_A14: HDR_L1.29 U4.G2 | length 1105.2
  Top Layer w5: v2(114.17,1803.15) 145.67,1803.15 ; 137.8,1803.15 177.16,1803.15 283.46,1696.85 507.87,1696.85 515.75,1688.98 601.38,1688.98 656.5,1744.09 913.39,1744.09 917.32,1748.03 956.69,1748.03 968.5,1748.03 1011.81,1748.03 1015.75,1751.97 1051.18,1751.97 U4.G2@1070.87,1732.28
  Bottom Layer w7.87: v2(114.17,1803.15) HDR_L1.29@173.23,1803.15
EXTEND_A15: HDR_L1.31 U4.G1 | length 1062.5
  Top Layer w5: v2(114.17,1771.65) 145.67,1771.65 ; 137.8,1771.65 177.16,1771.65 291.34,1657.48 507.87,1657.48 515.75,1665.35 599.41,1665.35 666.34,1732.28 956.69,1732.28 968.5,1732.28 U4.G1@1031.5,1732.28
  Bottom Layer w7.87: v2(114.17,1771.65) HDR_L1.31@173.23,1771.65
EXTEND_A16: HDR_L1.33 U4.H2 | length 1114.9
  Top Layer w5: v2(114.17,1740.16) 145.67,1740.16 ; 137.8,1740.16 177.16,1740.16 283.46,1633.86 507.87,1633.86 515.75,1625.98 593.5,1625.98 660.43,1692.91 956.69,1692.91 968.5,1692.91 1000,1692.91 1019.68,1712.6 1051.18,1712.6 U4.H2@1070.87,1692.91
  Bottom Layer w7.87: v2(114.17,1740.16) HDR_L1.33@173.23,1740.15
EXTEND_A17: HDR_L1.35 U4.H1 | length 1076.3
  Top Layer w5: v2(114.17,1708.66) 149.61,1708.66 ; 137.8,1708.66 177.16,1708.66 291.34,1594.49 507.87,1594.49 515.75,1602.36 590.55,1602.36 665.36,1677.17 956.69,1677.17 968.5,1677.17 1000,1677.17 1015.75,1692.91 U4.H1@1031.5,1692.91
  Bottom Layer w7.87: v2(114.17,1708.66) HDR_L1.35@173.23,1708.66
EXTEND_A18: HDR_L1.37 U4.J2 | length 1128.7
  Top Layer w5: v2(114.17,1677.17) 149.61,1677.17 ; 137.8,1677.17 177.16,1677.17 283.46,1570.86 507.87,1570.86 515.75,1562.99 574.8,1562.99 673.23,1661.42 956.69,1661.42 968.5,1661.42 1003.94,1661.42 1015.75,1673.23 1051.18,1673.23 U4.J2@1070.87,1653.54
  Bottom Layer w7.87: v2(114.17,1677.17) HDR_L1.37@173.23,1677.16
EXTEND_A19: HDR_L1.39 U4.J1 | length 1086
  Top Layer w5: v2(114.17,1645.67) 149.61,1645.67 ; 137.8,1645.67 177.16,1645.67 291.34,1531.49 507.87,1531.49 515.75,1539.37 574.8,1539.37 645.67,1610.24 913.39,1610.24 948.82,1645.67 956.69,1645.67 968.5,1645.67 1007.88,1645.67 1015.75,1653.54 U4.J1@1031.5,1653.54
  Bottom Layer w7.87: v2(114.17,1645.67) HDR_L1.39@173.23,1645.67
EXTEND_A20: HDR_L1.41 U4.K2 | length 1138.4
  Top Layer w5: v2(114.17,1614.17) 149.61,1614.17 ; 137.8,1614.17 177.16,1614.17 283.46,1507.87 507.87,1507.87 515.75,1500 559.05,1500 653.54,1594.49 913.39,1594.49 948.82,1629.92 956.69,1629.92 968.5,1629.92 1011.81,1629.92 1015.75,1633.86 1051.18,1633.86 U4.K2@1070.87,1614.17
  Bottom Layer w7.87: v2(114.17,1614.17) HDR_L1.41@173.23,1614.17
EXTEND_A21: HDR_L1.43 U4.K1 | length 1095.8
  Top Layer w5: v2(114.17,1582.68) 149.61,1582.68 ; 137.8,1582.68 177.16,1582.68 291.34,1468.5 507.87,1468.5 515.75,1476.38 559.05,1476.38 661.42,1578.74 917.32,1578.74 952.76,1614.17 956.69,1614.17 968.5,1614.17 U4.K1@1031.5,1614.17
  Bottom Layer w7.87: v2(114.17,1582.68) HDR_L1.43@173.23,1582.67
EXTEND_A22: HDR_L1.45 U4.L2 | length 1136.4
  Top Layer w5: v2(114.17,1551.18) 177.16,1551.18 283.46,1444.88 507.87,1444.88 515.75,1437.01 543.31,1437.01 669.29,1562.99 921.26,1562.99 952.76,1594.49 956.69,1594.49 968.5,1594.49 1051.18,1594.49 U4.L2@1070.87,1574.8
  Bottom Layer w7.87: v2(114.17,1551.18) HDR_L1.45@173.23,1551.18
EXTEND_A23: HDR_L1.47 U4.M2 | length 1154.8
  Top Layer w5: v2(114.17,1519.69) 149.61,1519.69 ; 137.8,1519.69 177.16,1519.69 291.34,1405.51 507.87,1405.51 519.68,1417.32 543.31,1417.32 673.23,1547.24 937.01,1547.24 968.5,1515.75 1051.18,1515.75 U4.M2@1070.87,1535.43
  Bottom Layer w7.87: v2(114.17,1519.69) HDR_L1.47@173.23,1519.68
EXTEND_A24: HDR_L1.49 U4.E8 | length 1418.3
  Top Layer w7.87: v1(1287.4,1830.71) U4.E8@1307.09,1811.02
  MidLayer2 w5: v2(114.17,1488.19) 145.67,1488.19 440.94,1783.46 507.87,1783.46 574.8,1850.39 956.69,1850.39 968.5,1850.39 1267.72,1850.39 v1(1287.4,1830.71)
  Bottom Layer w7.87: v2(114.17,1488.19) HDR_L1.49@173.23,1488.19
EXTEND_A25: HDR_L1.51 U4.F7 | length 1398.5
  Top Layer w7.87: v1(1248.03,1791.34) U4.F7@1267.72,1771.65
  MidLayer2 w5: v2(114.17,1456.69) 145.67,1456.69 448.82,1759.84 507.87,1759.84 519.68,1748.03 543.31,1748.03 622.05,1826.77 917.32,1826.77 933.07,1811.02 956.69,1811.02 968.51,1811.03 1228.35,1811.03 v1(1248.03,1791.34)
  Bottom Layer w7.87: v2(114.17,1456.69) HDR_L1.51@173.23,1456.69
EXTEND_A26: HDR_L1.53 U4.G5 | length 1293.7
  Top Layer w7.87: v1(1169.29,1751.97) U4.G5@1188.98,1732.28
  MidLayer2 w5: v2(114.17,1425.2) 145.67,1425.2 440.94,1720.47 507.87,1720.47 519.69,1732.28 547.24,1732.28 586.61,1771.65 956.69,1771.65 968.51,1771.65 1149.61,1771.65 v1(1169.29,1751.97)
  Bottom Layer w7.87: v2(114.17,1425.2) HDR_L1.53@173.23,1425.19
EXTEND_A27: HDR_L1.55 U4.H6 | length 1339.6
  Top Layer w7.87: v1(1208.66,1712.6) U4.H6@1228.35,1692.91
  MidLayer2 w5: v2(114.17,1393.7) 145.67,1393.7 448.81,1696.85 507.87,1696.85 519.68,1685.04 531.5,1685.04 578.74,1732.28 956.69,1732.28 968.51,1732.28 1188.98,1732.29 v1(1208.66,1712.6)
  Bottom Layer w7.87: v2(114.17,1393.7) HDR_L1.55@173.23,1393.7
EXTEND_A28: HDR_L1.57 U4.J5 | length 1287.2
  Top Layer w7.87: v1(1169.29,1673.23) U4.J5@1188.98,1653.54
  MidLayer2 w5: v2(114.17,1362.21) 145.67,1362.21 440.94,1657.48 507.87,1657.48 519.69,1669.29 535.43,1669.29 559.06,1692.91 956.69,1692.91 968.51,1692.91 1149.61,1692.91 v1(1169.29,1673.23)
  Bottom Layer w7.87: v2(114.17,1362.21) HDR_L1.57@173.23,1362.2
EXTEND_A29: HDR_L1.59 U4.K5 | length 1300.2
  Top Layer w7.87: v1(1169.29,1633.86) U4.K5@1188.98,1614.17
  MidLayer2 w5: v2(114.17,1330.71) 145.67,1330.71 448.81,1633.86 507.87,1633.86 519.68,1622.05 531.5,1622.05 570.87,1661.42 917.32,1661.42 925.2,1653.54 956.69,1653.54 968.51,1653.54 1149.61,1653.54 v1(1169.29,1633.86)
  Bottom Layer w7.87: v2(114.17,1330.71) HDR_L1.59@173.23,1330.71
EXTEND_A30: HDR_L1.61 U4.K6 | length 1320
  Top Layer w7.87: v1(1208.66,1633.86) U4.K6@1228.35,1614.17
  MidLayer2 w5: v2(114.17,1299.21) 145.67,1299.21 440.94,1594.49 507.87,1594.49 523.62,1610.24 921.26,1610.24 925.2,1614.17 956.69,1614.17 968.51,1614.18 1188.98,1614.17 v1(1208.66,1633.86)
  Bottom Layer w7.87: v2(114.17,1299.21) HDR_L1.61@173.23,1299.21
EXTEND_A31: HDR_L1.63 U4.L6 | length 1326.5
  Top Layer w7.87: v1(1208.66,1594.49) U4.L6@1228.35,1574.8
  MidLayer2 w5: v2(114.17,1267.72) 145.67,1267.72 448.81,1570.86 507.87,1570.86 519.68,1559.05 531.49,1559.05 547.24,1574.8 956.69,1574.8 968.51,1574.81 1188.98,1574.8 v1(1208.66,1594.49)
  Bottom Layer w7.87: v2(114.17,1267.72) HDR_L1.63@173.23,1267.71
EXTEND_A32: HDR_L1.65 U4.K9 | length 1505.3
  Top Layer w7.87: v1(1326.77,1633.86) U4.K9@1346.46,1614.17
  MidLayer2 w5: v2(114.17,1236.22) 145.67,1236.22 440.94,1531.49 507.87,1531.49 519.69,1543.31 917.32,1543.31 925.2,1535.43 956.69,1535.43 968.51,1535.43 1220.47,1535.43 1228.35,1543.31 1228.35,1602.36 1240.16,1614.17 1307.09,1614.17 v1(1326.77,1633.86)
  Bottom Layer w7.87: v2(114.17,1236.22) HDR_L1.65@173.23,1236.22
EXTEND_A33: HDR_L1.67 U4.L9 | length 1549.3
  Top Layer w7.87: v1(1326.77,1594.49) U4.L9@1346.46,1574.8
  MidLayer2 w5: v2(114.17,1204.72) 145.67,1204.72 448.81,1507.87 507.87,1507.87 519.68,1496.06 956.69,1496.06 968.51,1496.06 1334.65,1496.06 1346.46,1507.87 1346.46,1574.8 v1(1326.77,1594.49)
  Bottom Layer w7.87: v2(114.17,1204.72) HDR_L1.67@173.23,1204.72
EXTEND_A34: HDR_L1.69 U4.L10 | length 1637.8
  Top Layer w7.87: v1(1366.14,1594.49) U4.L10@1385.83,1574.8
  MidLayer2 w5: v2(114.17,1173.23) 145.67,1173.23 440.94,1468.5 507.87,1468.5 519.69,1480.31 716.54,1480.31 744.09,1452.76 925.2,1452.76 929.13,1456.69 956.69,1456.69 968.51,1456.69 1374.02,1456.69 1385.83,1468.5 1385.83,1574.8 v1(1366.14,1594.49)
  Bottom Layer w7.87: v2(114.17,1173.23) HDR_L1.69@173.23,1173.23
EXTEND_A35: HDR_L1.71 U4.P6 | length 1326.5
  Top Layer w7.87: v1(1208.66,1437.01) U4.P6@1228.35,1456.69
  MidLayer2 w5: v2(114.17,1141.73) 145.67,1141.73 448.81,1444.88 507.87,1444.88 519.68,1433.07 909.45,1433.07 925.2,1417.32 956.69,1417.32 968.51,1417.33 1188.98,1417.32 v1(1208.66,1437.01)
  Bottom Layer w7.87: v2(114.17,1141.73) HDR_L1.71@173.23,1141.73
EXTEND_A36: HDR_L1.73 U4.R6 | length 1339.6
  Top Layer w7.87: v1(1208.66,1397.64) U4.R6@1228.35,1417.32
  MidLayer2 w5: v2(114.17,1110.24) 145.67,1110.24 440.94,1405.51 507.87,1405.51 519.69,1417.32 874.02,1417.32 921.26,1370.08 956.69,1370.08 968.51,1370.08 1023.63,1370.08 1031.5,1377.96 1133.86,1377.95 1188.98,1377.95 v1(1208.66,1397.64)
  Bottom Layer w7.87: v2(114.17,1110.24) HDR_L1.73@173.23,1110.23
EXTEND_A37: HDR_L1.75 U4.T6 | length 1333
  Top Layer w7.87: v1(1208.66,1358.27) U4.T6@1228.35,1377.95
  MidLayer2 w5: v2(114.17,1078.74) 145.67,1078.74 448.81,1381.89 507.87,1381.89 519.68,1370.08 877.95,1370.08 909.45,1338.58 956.69,1338.58 968.51,1338.59 1188.98,1338.58 v1(1208.66,1358.27)
  Bottom Layer w7.87: v2(114.17,1078.74) HDR_L1.75@173.23,1078.74
EXTEND_A38: HDR_L1.77 U4.U5 | length 1300.2
  Top Layer w7.87: v1(1169.29,1318.9) U4.U5@1188.98,1338.58
  MidLayer2 w5: v2(114.17,1047.24) 145.67,1047.24 440.94,1342.52 507.87,1342.52 519.69,1354.33 874.02,1354.33 929.13,1299.21 956.69,1299.21 968.51,1299.21 1149.61,1299.21 v1(1169.29,1318.9)
  Bottom Layer w7.87: v2(114.17,1047.24) HDR_L1.77@173.23,1047.24
EXTEND_A39: HDR_L1.79 U4.V5 | length 1300.2
  Top Layer w7.87: v1(1169.29,1279.53) U4.V5@1188.98,1299.21
  MidLayer2 w5: v2(114.17,1015.75) 145.67,1015.75 448.81,1318.9 507.87,1318.9 519.68,1307.09 901.58,1307.09 948.82,1259.84 956.69,1259.84 968.51,1259.84 1149.61,1259.84 v1(1169.29,1279.53)
  Bottom Layer w7.87: v2(114.17,1015.75) HDR_L1.79@173.23,1015.74
EXTEND_A40: HDR_L1.81 U4.W6 | length 1346.1
  Top Layer w7.87: v1(1208.66,1240.16) U4.W6@1228.35,1259.84
  MidLayer2 w5: v2(114.17,984.25) 145.67,984.25 440.94,1279.53 507.87,1279.53 519.69,1291.34 814.96,1291.34 885.83,1220.47 956.69,1220.47 968.51,1220.47 1188.98,1220.47 v1(1208.66,1240.16)
  Bottom Layer w7.87: v2(114.17,984.25) HDR_L1.81@173.23,984.25
EXTEND_A41: HDR_L1.83 U4.Y5 | length 1306.7
  Top Layer w7.87: v1(1169.29,1200.78) U4.Y5@1188.98,1220.47
  MidLayer2 w5: v2(114.17,952.76) 145.67,952.75 448.81,1255.9 507.87,1255.9 519.69,1244.09 842.52,1244.09 905.51,1181.1 956.69,1181.1 968.51,1181.1 1149.61,1181.1 v1(1169.29,1200.78)
  Bottom Layer w7.87: v2(114.17,952.76) HDR_L1.83@173.23,952.75
EXTEND_A42: HDR_L1.85 U4.AA5 | length 1313.2
  Top Layer w7.87: v1(1169.29,1161.41) U4.AA5@1188.98,1181.1
  MidLayer2 w5: v2(114.17,921.26) 145.67,921.26 440.94,1216.53 507.87,1216.53 519.69,1228.34 838.58,1228.34 925.2,1141.73 956.69,1141.73 968.51,1141.73 1149.61,1141.73 v1(1169.29,1161.41)
  Bottom Layer w7.87: v2(114.17,921.26) HDR_L1.85@173.23,921.26
EXTEND_A43: HDR_L1.87 U4.AA6 | length 1387.4
  Top Layer w7.87: v1(1208.66,1161.41) U4.AA6@1228.35,1181.1
  MidLayer2 w5: v2(114.17,889.76) 145.67,889.76 448.81,1192.91 507.87,1192.91 519.69,1181.1 866.14,1181.1 944.88,1102.36 956.69,1102.36 968.5,1102.36 1181.1,1102.36 1188.98,1110.24 1188.98,1141.73 v1(1208.66,1161.41)
  Bottom Layer w7.87: v2(114.17,889.76) HDR_L1.87@173.23,889.76
EXTEND_A44: HDR_L1.89 U4.H8 | length 1907.1
  Top Layer w7.87: v1(1287.4,1712.6) U4.H8@1307.09,1692.91
  MidLayer3 w5: v2(114.17,858.27) 133.86,858.27 168.4,892.81 168.4,1365.25 460.63,1657.48 507.87,1657.48 526.57,1676.18 821.85,1676.18 877.95,1732.28 956.69,1732.28 968.5,1732.28 1267.72,1732.28 v1(1287.4,1712.6)
  Bottom Layer w7.87: v2(114.17,858.27) HDR_L1.89@173.23,858.26
EXTEND_A45: HDR_L1.91 U4.J6 | length 1831.6
  Top Layer w7.87: v1(1208.66,1673.23) U4.J6@1228.35,1653.54
  MidLayer3 w5: v2(114.17,826.77) 133.86,826.77 192.91,885.83 192.91,1358.27 468.5,1633.86 507.87,1633.86 515.75,1625.98 799.21,1625.98 866.14,1692.91 956.69,1692.91 968.51,1692.91 1188.98,1692.91 v1(1208.66,1673.23)
  Bottom Layer w7.87: v2(114.17,826.77) HDR_L1.91@173.23,826.77
EXTEND_A46: HDR_L1.93 U4.J8 | length 1907.1
  Top Layer w7.87: v1(1287.4,1673.23) U4.J8@1307.09,1653.54
  MidLayer3 w5: v2(114.17,795.28) 133.86,795.28 216.54,877.95 216.54,1350.39 460.63,1594.49 507.87,1594.49 519.68,1606.3 811.02,1606.3 866.14,1661.42 922.24,1661.42 930.12,1653.54 956.69,1653.54 968.51,1653.54 1267.72,1653.54 v1(1287.4,1673.23)
  Bottom Layer w7.87: v2(114.17,795.28) HDR_L1.93@173.23,795.27
EXTEND_A47: HDR_L1.95 U4.K7 | length 1867.7
  Top Layer w7.87: v1(1248.03,1633.86) U4.K7@1267.72,1614.17
  MidLayer3 w5: v2(114.17,763.78) 133.86,763.78 240.16,870.08 240.16,1342.52 468.5,1570.87 507.87,1570.87 519.68,1559.06 870.08,1559.06 925.2,1614.17 956.69,1614.17 968.51,1614.17 1228.35,1614.17 v1(1248.03,1633.86)
  Bottom Layer w7.87: v2(114.17,763.78) HDR_L1.95@173.23,763.78
EXTEND_A48: HDR_L1.97 U4.L7 | length 1854.9
  Top Layer w7.87: v1(1248.03,1594.49) U4.L7@1267.72,1574.8
  MidLayer3 w5: v2(114.17,732.28) 133.86,732.28 263.78,862.2 263.78,1334.65 460.63,1531.5 508.35,1531.5 508.35,1531.97 519.68,1543.31 881.89,1543.31 913.39,1574.8 956.69,1574.8 968.51,1574.8 1228.35,1574.8 v1(1248.03,1594.49)
  Bottom Layer w7.87: v2(114.17,732.28) HDR_L1.97@173.23,732.28
EXTEND_A49: HDR_L1.99 U4.K8 | length 1972.4
  Top Layer w7.87: v1(1287.4,1633.86) U4.K8@1307.09,1614.17
  MidLayer3 w5: v2(114.17,700.79) 133.86,700.79 287.4,854.33 287.4,1322.83 472.44,1507.87 507.87,1507.87 519.68,1496.06 870.08,1496.06 909.45,1535.43 956.69,1535.43 968.51,1535.43 1259.84,1535.43 1267.72,1543.31 1267.72,1614.17 v1(1287.4,1633.86)
  Bottom Layer w7.87: v2(114.17,700.79) HDR_L1.99@173.23,700.78
EXTEND_B0: HDR_L1.2 U4.D5 | length 1070.7
  Top Layer w7.87: v1(1169.29,1870.08) U4.D5@1188.98,1850.39
  MidLayer1 w5: v2(500,2244.1) 1062.99,2244.1 1129.53,2177.56 1129.53,2106.69 1149.61,2086.61 1149.61,2039.37 1149.61,2031.5 1149.61,1889.76 v1(1169.29,1870.08) ; v1@1167.32,1868.11 v1@1169.28,1866.15
  Bottom Layer w7.87: HDR_L1.2@440.94,2244.09 v2(500,2244.1)
EXTEND_B1: HDR_L1.4 U4.C4 | length 1021.5
  Top Layer w7.87: v1(1129.92,1909.45) U4.C4@1149.61,1889.76
  MidLayer1 w5: v2(523.62,2212.6) 527.56,2212.6 531.5,2208.66 1084.28,2208.66 1119.53,2173.42 1119.53,2080.16 1082.68,2043.31 1082.68,2039.37 1082.68,2031.5 1082.68,1992.13 1129.92,1944.88 v1(1129.92,1909.45)
  Bottom Layer w7.87: HDR_L1.4@440.94,2212.6 v2(523.62,2212.6)
EXTEND_B2: HDR_L1.6 U4.C3 | length 946.6
  Top Layer w7.87: v1(1090.55,1909.45) U4.C3@1110.24,1889.76
  MidLayer1 w5: v2(500,2181.1) 1047.24,2181.1 1098.43,2129.92 1098.43,2074.8 1070.87,2047.24 1070.87,1929.13 v1(1090.55,1909.45)
  Bottom Layer w7.87: HDR_L1.6@440.94,2181.1 v2(500,2181.1)
EXTEND_B3: HDR_L1.8 U4.E3 | length 809.5
  Top Layer w7.87: v1(1090.55,1830.71) U4.E3@1110.24,1811.02
  MidLayer1 w5: v2(523.62,2149.61) 618.11,2149.61 937.01,1830.71 956.69,1830.71 968.5,1830.71 v1(1090.55,1830.71)
  Bottom Layer w7.87: HDR_L1.8@440.94,2149.6 v2(523.62,2149.61)
EXTEND_B4: HDR_L1.10 U4.F3 | length 812.8
  Top Layer w7.87: v1(1090.55,1791.34) U4.F3@1110.24,1771.65
  MidLayer1 w5: v2(500,2118.11) 622.05,2118.11 940.94,1799.21 956.69,1799.21 968.5,1799.21 1063,1799.21 1070.87,1791.34 v1@1090.55,1791.34
  Bottom Layer w7.87: HDR_L1.10@440.94,2118.11 v2(500,2118.11)
EXTEND_B5: HDR_L1.12 U4.G4 | length 862
  Top Layer w7.87: v1(1129.92,1751.97) U4.G4@1149.61,1732.28
  MidLayer1 w5: v2(523.62,2086.62) 834.65,1775.59 917.32,1775.59 925.2,1783.46 956.69,1783.46 968.5,1783.46 1059.05,1783.46 1070.87,1771.65 1110.24,1771.65 v1(1129.92,1751.97)
  Bottom Layer w7.87: HDR_L1.12@440.94,2086.61 v2(523.62,2086.62)
EXTEND_B6: HDR_L1.14 U4.G3 | length 806.3
  Top Layer w7.87: v1(1090.55,1751.97) U4.G3@1110.24,1732.28
  MidLayer1 w5: v2(500,2055.12) 523.62,2055.12 814.96,1763.78 937.01,1763.78 940.94,1767.72 956.69,1767.72 968.5,1767.72 1051.18,1767.72 1066.93,1751.97 v1@1090.55,1751.97
  Bottom Layer w7.87: HDR_L1.14@440.94,2055.12 v2(500,2055.12)
EXTEND_B7: HDR_L1.16 U4.H4 | length 845.6
  Top Layer w7.87: v1(1129.92,1712.6) U4.H4@1149.61,1692.91
  MidLayer1 w5: v2(523.62,2023.62) 795.28,1751.97 956.69,1751.97 968.5,1751.97 1043.31,1751.97 1062.99,1732.28 1110.24,1732.28 v1(1129.92,1712.6)
  Bottom Layer w7.87: HDR_L1.16@440.94,2023.62 v2(523.62,2023.62)
EXTEND_B8: HDR_L1.18 U4.H3 | length 793.2
  Top Layer w7.87: v1(1090.55,1712.6) U4.H3@1110.24,1692.91
  MidLayer1 w5: v2(500,1992.13) 523.62,1992.13 779.53,1736.22 956.69,1736.22 968.5,1736.22 1039.37,1736.22 1062.99,1712.6 v1@1090.55,1712.6
  Bottom Layer w7.87: HDR_L1.18@440.94,1992.12 v2(500,1992.13)
EXTEND_B9: HDR_L1.20 U4.J4 | length 839.1
  Top Layer w7.87: v1(1129.92,1673.23) U4.J4@1149.61,1653.54
  MidLayer1 w5: v2(523.62,1960.63) 795.28,1688.98 956.69,1688.98 968.5,1688.98 1059.05,1688.98 1062.99,1692.91 1110.24,1692.91 v1(1129.92,1673.23)
  Bottom Layer w7.87: HDR_L1.20@440.94,1960.63 v2(523.62,1960.63)
EXTEND_B10: HDR_L1.22 U4.J3 | length 783.4
  Top Layer w7.87: v1(1090.55,1673.23) U4.J3@1110.24,1653.54
  MidLayer1 w5: v2(500,1929.14) 523.62,1929.14 775.59,1677.17 956.69,1677.17 968.51,1677.17 1059.06,1677.17 1062.99,1673.23 v1@1090.55,1673.23
  Bottom Layer w7.87: HDR_L1.22@440.94,1929.13 v2(500,1929.14)
EXTEND_B11: HDR_L1.24 U4.K4 | length 826.1
  Top Layer w7.87: v1(1129.92,1633.86) U4.K4@1149.61,1614.17
  MidLayer1 w5: v2(523.62,1897.64) 759.84,1661.42 956.69,1661.42 968.5,1661.42 1066.93,1661.42 1074.8,1653.54 1110.24,1653.54 v1(1129.92,1633.86)
  Bottom Layer w7.87: HDR_L1.24@440.94,1897.64 v2(523.62,1897.64)
EXTEND_B12: HDR_L1.26 U4.K3 | length 799.8
  Top Layer w7.87: v1(1090.55,1633.86) U4.K3@1110.24,1614.17
  MidLayer1 w5: v2(500,1866.14) 523.62,1866.14 779.53,1610.24 913.38,1610.24 944.88,1641.73 956.69,1641.73 968.5,1641.73 1062.99,1641.73 1070.87,1633.86 v1(1090.55,1633.86)
  Bottom Layer w7.87: HDR_L1.26@440.94,1866.14 v2(500,1866.14)
EXTEND_B13: HDR_L1.28 U4.L4 | length 839.1
  Top Layer w7.87: v1(1129.92,1594.49) U4.L4@1149.61,1574.8
  MidLayer1 w5: v2(523.62,1834.65) 759.84,1598.43 917.32,1598.43 944.88,1625.99 956.69,1625.99 968.5,1625.98 1055.12,1625.98 1066.93,1614.17 1110.24,1614.17 v1(1129.92,1594.49)
  Bottom Layer w7.87: HDR_L1.28@440.94,1834.64 v2(523.62,1834.65)
EXTEND_B14: HDR_L1.30 U4.L3 | length 783.4
  Top Layer w7.87: v1(1090.55,1594.49) U4.L3@1110.24,1574.8
  MidLayer1 w5: v2(500,1803.15) 519.68,1803.15 736.22,1586.61 925.2,1586.61 948.82,1610.24 956.69,1610.24 968.5,1610.24 1051.18,1610.24 1066.93,1594.49 v1(1090.55,1594.49)
  Bottom Layer w7.87: HDR_L1.30@440.94,1803.15 v2(500,1803.15)
EXTEND_B15: HDR_L1.32 U4.M5 | length 862.2
  Top Layer w7.87: v1(1169.29,1555.12) U4.M5@1188.98,1535.43
  MidLayer1 w5: v2(523.62,1771.66) 720.48,1574.8 933.07,1574.8 952.76,1594.49 956.69,1594.49 968.5,1594.49 1035.43,1594.49 1055.12,1574.8 1149.61,1574.8 v1(1169.29,1555.12)
  Bottom Layer w7.87: HDR_L1.32@440.94,1771.65 v2(523.62,1771.66)
EXTEND_B16: HDR_L1.34 U4.M3 | length 767.1
  Top Layer w7.87: v1(1090.55,1555.12) U4.M3@1110.24,1535.43
  MidLayer1 w5: v2(500,1740.16) 519.68,1740.16 696.85,1562.99 937.01,1562.99 952.76,1578.74 956.69,1578.74 968.5,1578.74 1027.56,1578.74 1051.18,1555.12 v1@1090.55,1555.12
  Bottom Layer w7.87: HDR_L1.34@440.94,1740.15 v2(500,1740.16)
EXTEND_B17: HDR_L1.36 U4.M4 | length 803.2
  Top Layer w7.87: v1(1129.92,1555.12) U4.M4@1149.61,1535.43
  MidLayer1 w5: v2(523.62,1708.66) 688.98,1543.31 940.94,1543.31 956.69,1527.56 968.5,1527.56 1070.87,1527.56 1078.74,1535.43 1110.23,1535.43 v1(1129.92,1555.12)
  Bottom Layer w7.87: HDR_L1.36@440.94,1708.66 v2(523.62,1708.66)
EXTEND_B18: HDR_L1.38 U4.P4 | length 829.3
  Top Layer w7.87: v1(1129.92,1437.01) U4.P4@1149.61,1456.69
  MidLayer1 w5: v2(500,1677.17) 523.62,1677.17 759.84,1440.94 956.69,1440.94 968.5,1440.94 1062.99,1440.94 1078.74,1456.69 1110.23,1456.69 v1(1129.92,1437.01)
  Bottom Layer w7.87: HDR_L1.38@440.94,1677.16 v2(500,1677.17)
EXTEND_B19: HDR_L1.40 U4.P3 | length 770.4
  Top Layer w7.87: v1(1090.55,1437.01) U4.P3@1110.24,1456.69
  MidLayer1 w5: v2(523.62,1645.67) 740.16,1429.13 956.69,1429.13 968.5,1429.13 1066.93,1429.13 1074.8,1437.01 v1(1090.55,1437.01)
  Bottom Layer w7.87: HDR_L1.40@440.94,1645.67 v2(523.62,1645.67)
EXTEND_B20: HDR_L1.42 U4.R4 | length 806.5
  Top Layer w7.87: v1(1129.92,1397.64) U4.R4@1149.61,1417.32
  MidLayer1 w5: v2(500,1614.17) 523.62,1614.17 641.73,1496.06 720.47,1417.32 956.69,1417.32 968.5,1417.32 1110.23,1417.32 v1(1129.92,1397.64)
  Bottom Layer w7.87: HDR_L1.42@440.94,1614.17 v2(500,1614.17)